# Altium PCB Control_Board.PcbDoc (part 4 of 4)
Units mm, origin at the board's own origin, x right, y up, seen from the top; angles counter-clockwise.
Board outline 90.17 x 96 mm, 6 copper layers (Top Layer, GND, POWER, Signal, PGND, Bottom Layer), stack 1.346 mm thick; 251 components, 196 nets, 963 pads, 633 vias.
Unrouted connection lines stored in the file: 3.
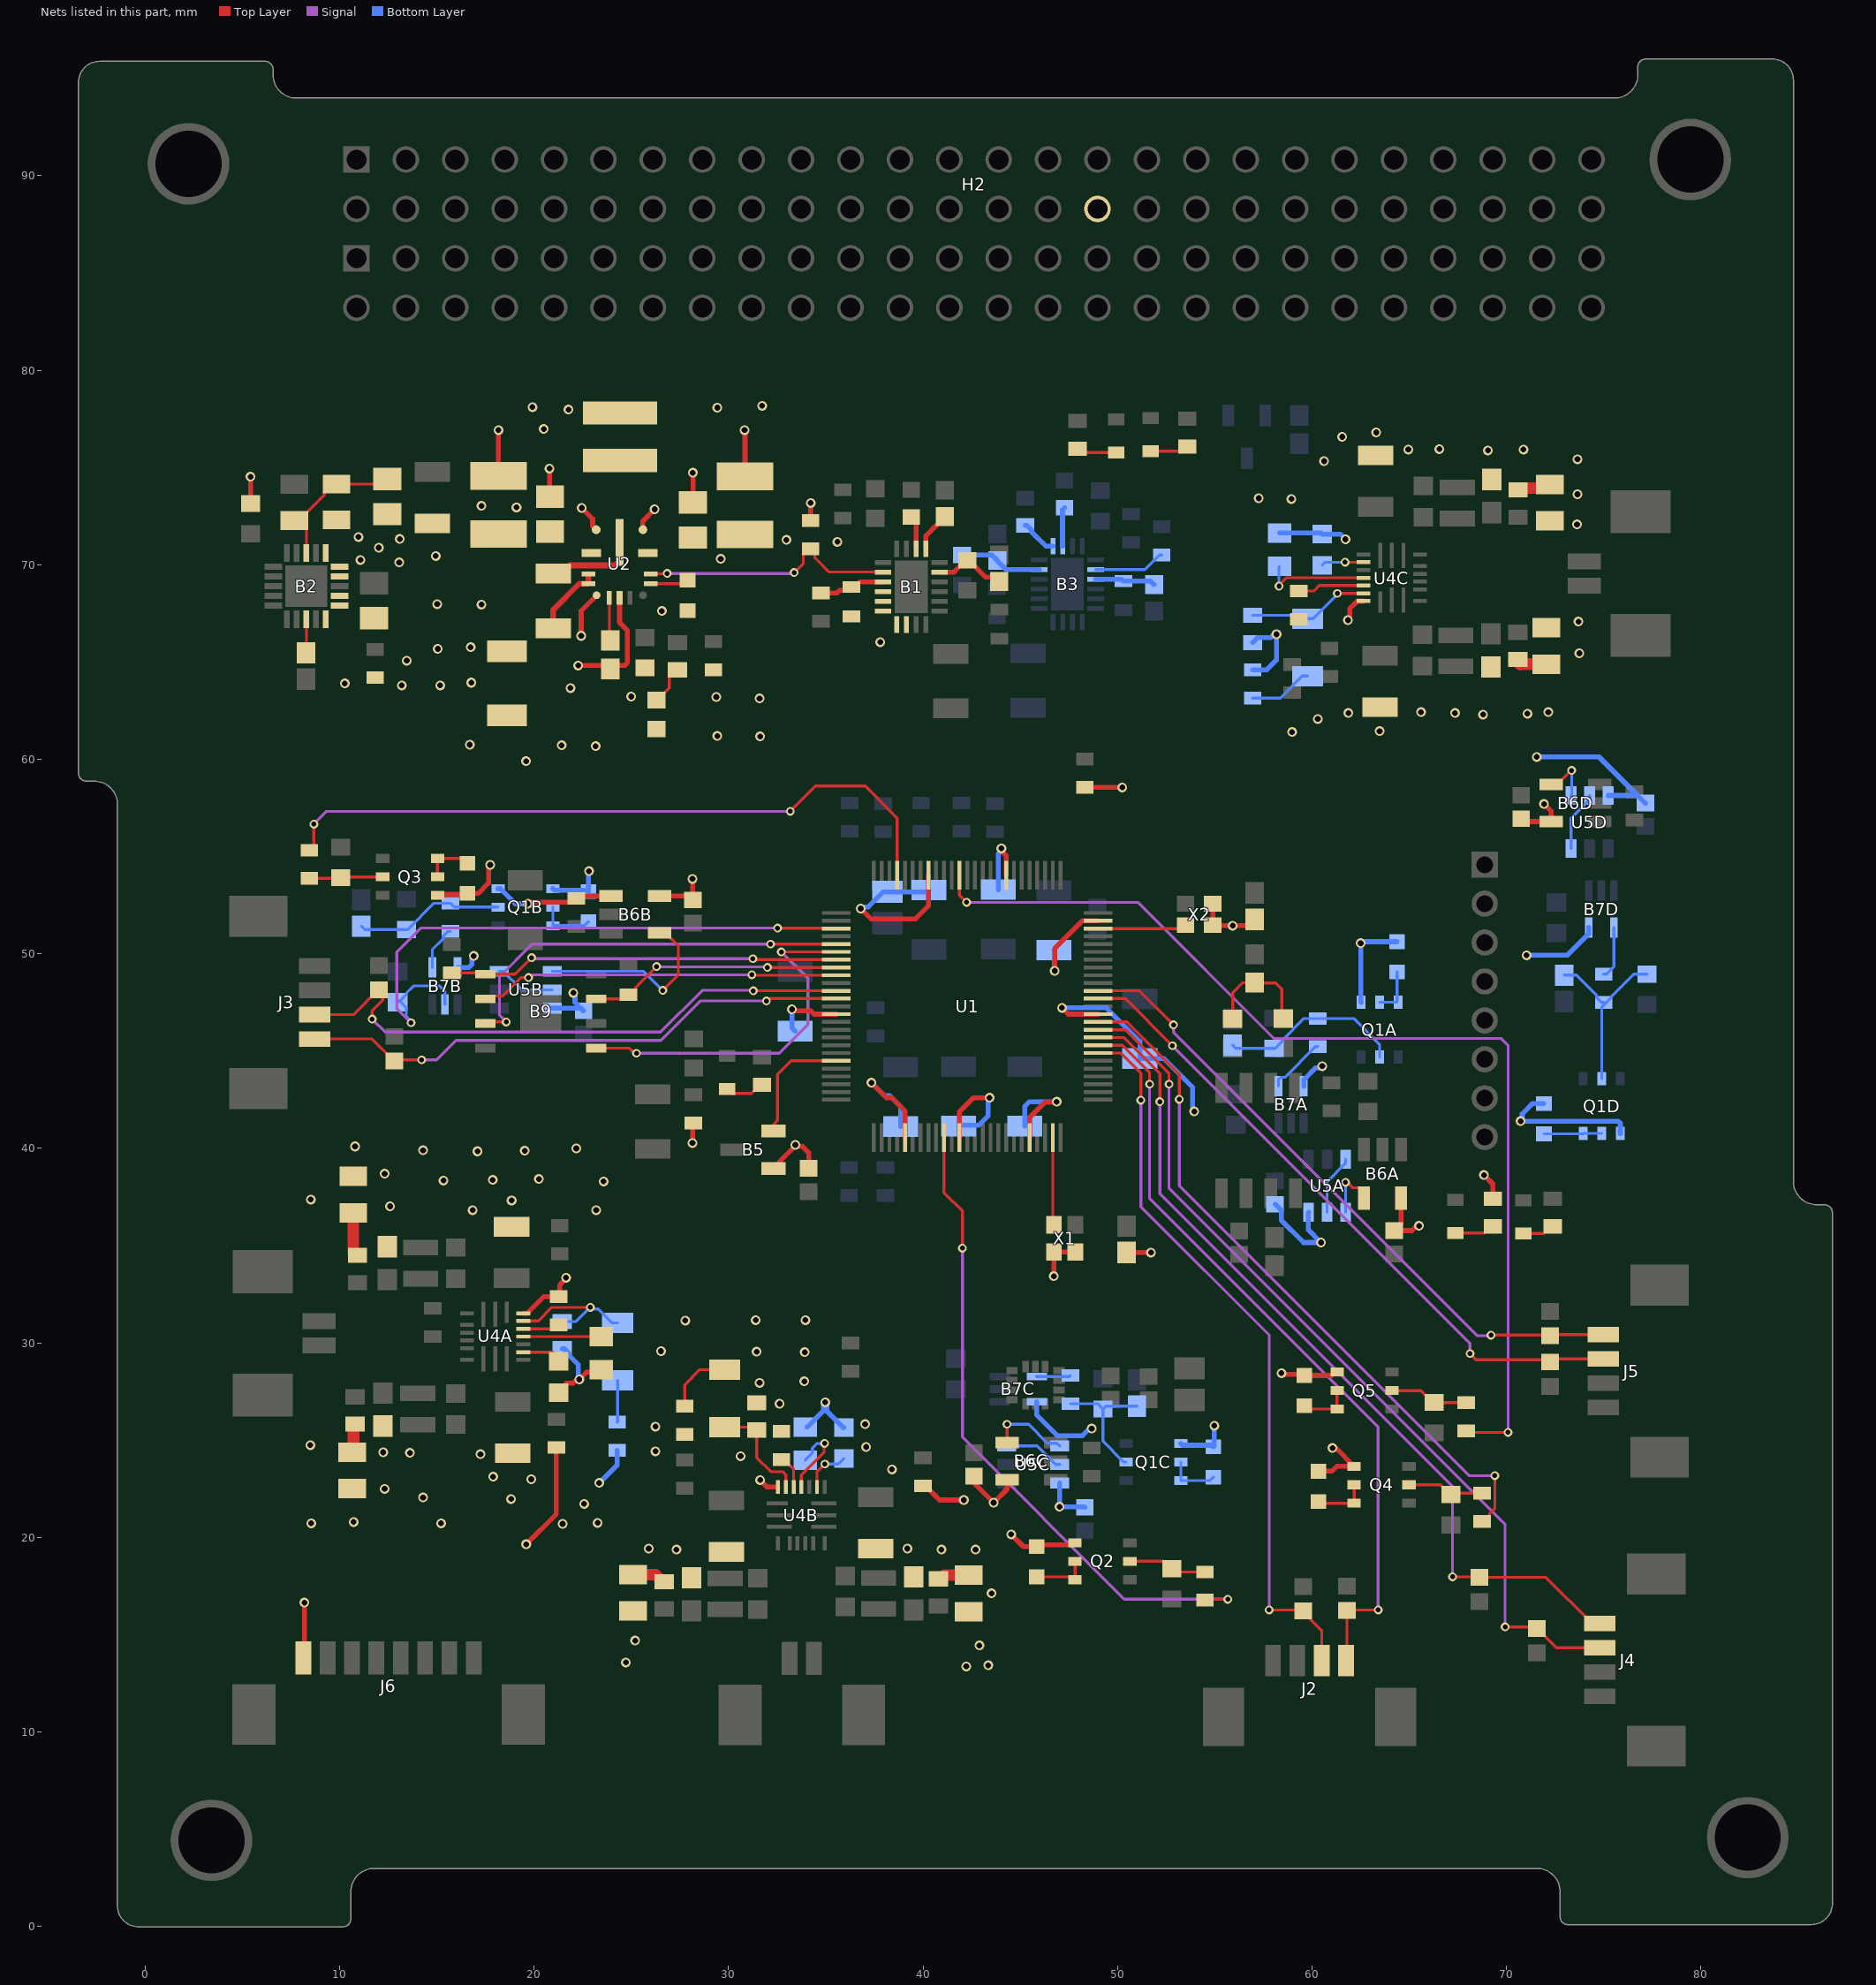
[diagram p7: the nets of this part, all layers, seen from the top]

## Via types
v1: diameter 0.5, hole 0.3, Top Layer to Bottom Layer, 487 vias
v2: diameter 0.45, hole 0.25, Top Layer to Bottom Layer, tented both sides, 146 vias

## Nets (pads, with @x,y where several pads share a name; then routed paths per layer and width w, separated by ;. In a path a pad name is that pad's centre, name@x,y a point inside that pad or via, vN(x,y) a via of type N, cw(c..) or ccw(c..) an arc to the next point about the centre after c; other vN are vias at no path point) (continued)
MRAM-CS: B9.1 R74.1 U1.7 | length 20.2
  Top Layer w0.15: R74.1@15.775,49.025 17.43,49.025 17.505,48.95 19.025,48.95 v2(19.875,49.8) ; v2(31.25,49.75) 31.3,49.7 U1.7@35.537,49.7
  Signal w0.15: v2(19.875,49.8) 19.925,49.75 v2(31.25,49.75)
MRAM-EN: B7B.2 R58B.2 U1.3 | length 32
  Top Layer w0.15: v2(32.525,51.325) 32.538,51.312 35.524,51.312 U1.3@35.537,51.3
  Signal w0.15: v2(13.677,46.459) 12.95,47.185 12.95,50.1 14.175,51.325 v2(32.525,51.325)
  Bottom Layer w0.15: R58B.2@13,47.51 R58B.2@13.082,47.592 ; v2(13.677,46.459) 13.677,46.567 13.435,46.809 13.435,47.239 R58B.2@13.082,47.592 ; B7B.2@15.425,47.4 15.425,48.065 15.14,48.35 13.814,48.35 13.435,47.971 13.435,47.905 13.122,47.592 R58B.2@13.082,47.592
MRAM-HOLD: B9.7 R75.2 U1.8 | length 13.1
  Top Layer w0.15: B9.7@23.2,47.685 24.635,47.685 R75.2@24.85,47.9 ; R75.2@24.851,47.9 24.975,47.9 25.225,48.15 25.225,48.274 v2(26.3,49.35) ; v2(32,49.3) U1.8@35.537,49.3
  Signal w0.15: v2(26.3,49.35) 26.325,49.325 31.975,49.325 v2(32,49.3)
MRAM-MISO: B9.2 U1.9 | length 18.6
  Top Layer w0.15: B9.2@17.5,47.685 17.65,47.835 18.395,47.835 19.326,48.766 19.706,48.766 v2(19.72,48.78) ; v2(31.2,48.925) 31.225,48.9 U1.9@35.537,48.9
  Signal w0.15: v2(19.72,48.78) 19.801,48.78 19.946,48.925 v2(31.2,48.925)
MRAM-MOSI: B9.5 U1.6 | length 18.7
  Top Layer w0.15: B9.5@23.2,45.145 23.205,45.15 24.902,45.15 25.162,44.89 v2(25.27,44.89) ; v2(32.72,50.1) U1.6@35.537,50.1
  Signal w0.15: v2(25.27,44.89) 32.61,44.89 34.08,46.36 34.08,48.74 v2(32.72,50.1)
MRAM-VSEN: B6B.1 Q1B.3 R73.2 | length 6.3
  Top Layer w0.254: v1(19.675,52.575) 19.76,52.66 21.985,52.66 R73.2@22.175,52.85 ; R73.2@22.162,52.837 22.3,52.975 B6B.1@23.95,52.975
  Bottom Layer w0.254: Q1B.3@18.156,53.35 18.27,53.35 19.045,52.575 v1(19.675,52.575)
MRAM-WP: B9.3 U1.5 | length 21.6
  Top Layer w0.15: B9.3@17.5,46.415 17.584,46.499 v2(18.572,46.499) ; v2(32.16,50.5) U1.5@35.537,50.5
  Signal w0.15: v2(18.572,46.499) 18.23,46.841 18.23,48.83 19.9,50.5 v2(32.16,50.5)
NetB1_3: B1.3 R18.2 R21.2 | length 3.4
  Top Layer w0.254: R21.2@34.75,68.55 35.581,68.55 35.708,68.677 36.152,68.677 R18.2@36.325,68.85 36.475,68.85 36.75,69.125 B1.3@37.95,69.125
NetB1_17: B1.17 R25.2 | length 2.1
  Top Layer w0.254: B1.17@40.15,70.825 40.15,71.495 40.767,72.112 40.787,72.112 41.125,72.45 R25.2@41.125,72.47
NetB1_18: B1.18 C14.1 | length 1.7
  Top Layer w0.254: C14.1@39.375,72.422 39.65,72.147 B1.18@39.65,70.825
NetB2_3: B2.3 C15.2 R28.2 R30.2 | length 7.8
  Top Layer w0.15: B2.3@8.3,70.6 8.3,71.86 7.89,72.27 R30.2@7.675,72.27 7.9,72.27 9.227,73.596 9.227,73.745 9.631,74.149 R28.2@9.85,74.149 12.199,74.149 C15.2@12.45,74.4
NetB2_13: B2.13 C18.2 | length 1.7
  Top Layer w0.15: C18.2@8.275,65.478 8.3,65.503 B2.13@8.3,67.2
NetB3_3: B3.3 R39.2 R41.2 | length 3.1
  Bottom Layer w0.254: B3.3@48.875,69.25 48.877,69.248 50.212,69.248 R39.2@50.302,69.159 51.696,69.159 R41.2@51.875,68.98
NetB3_17: B3.17 R44.1 | length 1.9
  Bottom Layer w0.254: R44.1@45.25,72.027 45.339,72.027 45.593,71.773 45.593,71.684 46.326,70.95 B3.17@46.675,70.95
NetB3_18: B3.18 C29.1 | length 2
  Bottom Layer w0.254: B3.18@47.175,70.95 47.175,72.825 C29.1@47.275,72.925
NetB7A_4: B7A.4 R57A.2 | length 3.1
  Bottom Layer w0.15: B7A.4@58.275,43.2 58.275,43.525 58.4,43.65 58.6,43.65 60.175,45.225 R57A.2@60.3,45.225
NetB7B_4: B7B.4 R57B.2 | length 2.3
  Bottom Layer w0.15: B7B.4@14.775,49.3 14.775,50.225 15.325,50.775 15.325,50.9 15.575,51.15 R57B.2@15.7,51.15
NetB7C_4: B7C.4 R57C.2 | length 1.8
  Bottom Layer w0.15: B7C.4@45.85,28.275 47.533,28.275 R57C.2@47.583,28.325
NetB7D_4: B7D.4 R57D.2 | length 2.7
  Bottom Layer w0.15: R57D.2@75,48.95 75.125,48.95 75.525,49.35 B7D.4@75.525,51.35
NetC22_1: C22.1 U2.13 U2.14 | length 3.8
  Top Layer w0.305: C22.1@20.987,66.738 20.987,67.687 22.325,69.025 U2.14@22.8,69.025 U2.13@22.8,69.525
NetC24_2: C24.2 R32.2 | length 2.1
  Top Layer w0.15: R32.2@26.3,63.047 26.341,63.047 26.955,63.661 26.955,64.285 27.27,64.6 C24.2@27.375,64.6
NetC26_2: C26.2 U2.2 | length 2.2
  Top Layer w0.15: U2.2@23.875,68.3 23.875,66.153 C26.2@23.925,66.103
NetC35A_1: C35A.1 C41A.1 U4A.18 | length 7.2
  Top Layer w0.15: U4A.18@19.45,31.125 20.225,31.125 20.925,31.825 v2(22.9,31.825)
  Bottom Layer w0.15: C41A.1@21.45,31.1 22.175,31.1 v2(22.9,31.825) 22.977,31.748 23.302,31.748 24.025,31.025 C35A.1@24.3,31.025
NetC35A_2: C35A.2 R56A.2 | length 2.2
  Bottom Layer w0.15: R56A.2@24.275,25.925 24.3,25.95 C35A.2@24.3,28.075
NetC35B_1: C35B.1 C41B.1 U4B.18 | length 5.6
  Top Layer w0.15: C35B.1@29.8,25.675 31.3,25.675 C41B.1@31.45,25.525 31.45,24.1 32.17,23.38 32.78,23.38 32.95,23.21 U4B.18@32.95,22.6
NetC35B_2: C35B.2 R56B.2 | length 3.5
  Top Layer w0.15: R56B.2@27.75,26.75 27.75,27.85 28.525,28.625 C35B.2@29.8,28.625
NetC35C_1: C35C.1 C41C.1 U4C.18 | length 6.3
  Top Layer w0.15: v2(61.3,68.526) 61.302,68.528 62.65,68.528 U4C.18@62.653,68.531
  Bottom Layer w0.15: C41C.1@56.95,67.401 59.6,67.401 C35C.1@59.775,67.226 60.05,67.226 61.3,68.476 v2(61.3,68.526)
NetC35C_2: C35C.2 R56C.2 | length 3.3
  Bottom Layer w0.15: R56C.2@56.95,63.151 58.375,63.151 59.5,64.276 C35C.2@59.775,64.276
NetC36A_1: C36A.1 U4A.14 | length 2
  Top Layer w0.15: U4A.14@19.45,29.525 20.975,29.525 C36A.1@21.325,29.175
NetC36B_1: C36B.1 U4B.14 | length 2.4
  Top Layer w0.15: U4B.14@34.55,22.6 34.55,23.375 v2(34.95,23.775)
  Bottom Layer w0.15: v2(34.95,23.775) 35.65,23.775 C36B.1@35.925,24.05
NetC36C_1: C36C.1 U4C.14 | length 2.2
  Top Layer w0.15: v2(61.705,70.131) U4C.14@62.653,70.131
  Bottom Layer w0.15: C36C.1@60.525,69.976 60.68,70.131 v2(61.705,70.131)
NetC42A_2: C42A.2 R52A.2 | length 2.3
  Top Layer w0.6: R52A.2@10.715,36.688 10.715,34.605 10.82,34.5 C42A.2@10.925,34.5
NetC42B_2: C42B.2 R52B.2 | length 1.8
  Top Layer w0.6: R52B.2@25.1,18.085 26.26,18.085 26.505,17.84 26.505,17.815 26.595,17.725 C42B.2@26.7,17.725
NetC42C_2: C42C.2 R52C.2 | length 1.6
  Top Layer w0.6: C42C.2@70.375,65.1 70.48,65.1 C42C.2@70.715,64.865 ; C42C.2@70.927,64.89 R52C.2@72.047,64.89
NetC43A_2: C43A.2 R54A.2 | length 1.5
  Top Layer w0.6: R54A.2@10.65,24.385 10.725,24.46 10.725,25.75 C43A.2@10.8,25.825
NetC43B_2: C43B.2 R54B.2 | length 1.6
  Top Layer w0.6: C43B.2@40.8,17.875 40.905,17.875 41.09,18.06 R54B.2@42.35,18.06
NetC43C_2: C43C.2 R54C.2 | length 1.7
  Top Layer w0.6: C43C.2@70.44,73.85 70.53,73.94 71.915,73.94 R54C.2@72.06,74.085
NetC47_1: C47.1 R62.2 R63.2 | length 5.5
  Top Layer w0.15: R62.2@55.925,46.617 55.925,48 56.438,48.513 57.041,48.513 C47.1@57.05,48.522 ; C47.1@57.05,48.494 58.137,48.494 58.45,48.182 R63.2@58.45,46.95
NetLED1_2: LED1.2 R3.1 | length 1.7
  Top Layer w0.15: LED1.2@30.2,42.824 31.184,42.824 31.623,43.264 R3.1@31.725,43.264
NetLED2_2: LED2.2 R19.1 | length 2.1
  Top Layer w0.15: LED2.2@67.375,35.649 68.859,35.649 69.198,35.989 R19.1@69.3,35.989
NetLED3_2: LED3.2 R23.1 | length 1.9
  Top Layer w0.15: R23.1@47.95,75.964 48.14,75.774 LED3.2@49.75,75.774
NetLED4_2: LED4.2 R36.1 | length 1.7
  Top Layer w0.15: LED4.2@70.875,35.624 71.909,35.624 72.273,35.989 R36.1@72.375,35.989
NetLED5_2: LED5.2 R37.1 | length 2.1
  Top Layer w0.15: LED5.2@51.714,75.84 53.476,75.84 R37.1@53.71,76.074
NetQ1A_5: Q1A.5 Q1A.6 R59A.1 | length 2.4
  Bottom Layer w0.15: Q1A.5@63.475,47.51 64.325,47.51 64.375,47.56 R59A.1@64.375,49.069
NetQ1B_5: Q1B.5 Q1B.6 R59B.1 | length 2.9
  Bottom Layer w0.15: Q1B.5@20.975,52.4 Q1B.6@20.975,51.45 22.603,51.45 R59B.1@22.8,51.647
NetQ1C_5: Q1C.5 Q1C.6 R59C.1 | length 2.7
  Bottom Layer w0.15: Q1C.5@53.26,23.875 Q1C.6@53.26,22.925 54.753,22.925 R59C.1@54.925,23.097
NetQ1D_5: Q1D.5 Q1D.6 R59D.1 | length 3
  Bottom Layer w0.15: R59D.1@71.925,40.747 73.932,40.747 Q1D.6@73.95,40.765 Q1D.5@74.9,40.765
NetQ2_2: Q2.2 R76.1 R79.2 | length 4.1
  Top Layer w0.15: Q2.2@50.635,18.775 52.363,18.775 52.743,18.395 R79.2@52.798,18.395 52.968,18.225 R76.1@54.5,18.225
NetQ2_5: Q2.5 Q2.6 R78.1 | length 3
  Top Layer w0.15: R78.1@45.85,17.972 47.668,17.972 Q2.6@47.815,17.825 Q2.5@47.815,18.775
NetQ3_2: Q3.2 R77.1 R81.2 | length 3.8
  Top Layer w0.15: R77.1@8.45,53.875 10.014,53.875 R81.2@10.057,53.918 10.094,53.955 Q3.2@12.22,53.955
NetQ3_5: Q3.5 Q3.6 R80.1 | length 2.6
  Top Layer w0.15: Q3.5@15.039,53.955 Q3.6@15.039,54.905 16.328,54.905 R80.1@16.572,54.66
NetQ4_2: Q4.2 R82.1 R86.2 | length 3.8
  Top Layer w0.15: Q4.2@64.987,22.708 66.592,22.708 R86.2@67.095,22.205 ; R86.2@67.22,22.275 R82.1@68.75,22.275
NetQ4_5: Q4.5 Q4.6 R84.1 | length 2.7
  Top Layer w0.15: R84.1@60.414,21.758 Q4.6@62.168,21.758 Q4.5@62.168,22.708
NetQ5_2: Q5.2 R83.1 R87.2 | length 4.1
  Top Layer w0.15: Q5.2@64.11,27.55 65.61,27.55 66.218,26.942 R87.2@66.273,26.942 66.29,26.925 R83.1@67.925,26.925
NetQ5_5: Q5.5 Q5.6 R85.1 | length 2.7
  Top Layer w0.15: R85.1@59.6,26.772 59.772,26.6 Q5.6@61.29,26.6 Q5.5@61.29,27.55
NetR33_1: R33.1 U2.6 | length 2
  Top Layer w0.15: U2.6@26,69.025 27.722,69.025 R33.1@27.9,69.203
NetR50A_2: R50A.2 U4A.16 | length 4
  Top Layer w0.15: U4A.16@19.45,30.325 23.447,30.325 R50A.2@23.45,30.328
NetR50B_2: R50B.2 U4B.16 | length 4.2
  Top Layer w0.15: U4B.16@33.75,22.6 33.75,23.209 34.911,24.37 34.911,24.806 v2(34.945,24.84)
  Bottom Layer w0.15: R50B.2@33.95,23.972 34.317,24.339 34.317,24.591 34.558,24.832 34.937,24.832 v2(34.945,24.84)
NetR50C_2: R50C.2 U4C.16 | length 5.6
  Top Layer w0.15: v2(58.3,68.901) 58.3,68.947 58.683,69.331 U4C.16@62.653,69.331
  Bottom Layer w0.15: v2(58.3,68.901) 58.3,69.898 R50C.2@58.325,69.923
NetR51A_1: R51A.1 U4A.17 | length 1.9
  Top Layer w0.15: U4A.17@19.45,30.725 21.075,30.725 R51A.1@21.275,30.925
NetR51B_1: R51B.1 U4B.17 | length 1.7
  Top Layer w0.15: R51B.1@32.725,24 32.85,24 33.35,23.5 U4B.17@33.35,22.6
NetR51C_1: R51C.1 U4C.17 | length 3.4
  Top Layer w0.15: R51C.1@59.325,68.651 60.1,68.651 60.38,68.931 U4C.17@62.653,68.931
OVP-3V3: B1.15 R20.1 R24.2 | length 3.8
  Top Layer w0.254: B1.15@40.85,69.625 41.595,69.625 42.22,70.25 42.275,70.25 42.33,70.25 43.217,69.363 43.622,69.363 R24.2@43.925,69.06
OVP-5V: B3.15 R40.1 R43.2 | length 4.3
  Bottom Layer w0.254: R40.1@42,70.495 43.55,70.495 R43.2@43.825,70.22 43.825,70.2 44.275,69.75 B3.15@45.975,69.75
PG-STEP-3V3: B1.2 R27.2 U2.7 | length 13.4
  Top Layer w0.15: U2.7@26,69.525 26.013,69.537 26.838,69.537 v2(26.85,69.55) ; v2(33.375,69.6) 33.85,70.075 33.85,70.575 34.1,70.825 R27.2@34.225,70.825 34.437,70.613 34.437,70.363 35.175,69.625 B1.2@37.95,69.625
  Signal w0.15: v2(26.85,69.55) 33.325,69.55 v2(33.375,69.6)
PG-STEP-5V: B3.2 R46.2 | length 3.7
  Bottom Layer w0.15: B3.2@48.875,69.75 51.4,69.75 52.15,70.5 R46.2@52.275,70.5
PGND: C19.2 C20.2 C21.2 C23.2 C25.1 C26.1 C36A.2 C36B.2 C36C.2 C37A.2 C37B.2 C37C.2 C38A.2 C38B.2 C38C.2 C39A.1 C39B.1 C39C.1 C40A.1 C40B.1 C40C.1 C41A.2 C41B.2 C41C.2 H2.32 R33.2 R35.1 R50A.1 R50B.1 R50C.1 R51A.2 R51B.2 R51C.2 R52A.1 R52B.1 R52C.1 R54A.1 R54B.1 R54C.1 R56A.1 R56B.1 R56C.1 U2.3 U2.9 U2.11 U4A.19 U4B.19 U4C.19 | length 40.5
  Top Layer w0.254: C37A.2@12.5,35.225 C37A.2@12.5,35.275 ; C21.2@18.175,74.565 v1(18.175,76.925) ; U4A.19@19.45,31.525 19.653,31.525 20.503,32.375 R51A.2@21.275,32.375 21.325,32.425 21.325,32.977 21.65,33.302 v1(21.65,33.35) ; v1(20.8,74.95) 20.8,73.225 C19.2@20.825,73.2 ; C36A.2@21.325,27.575 21.673,27.923 22.002,27.923 22.204,28.125 v1(22.325,28.125) ; v1(22.275,64.825) 23.747,64.825 C26.1@23.925,64.647 24.109,64.832 24.682,64.832 24.8,64.95 24.8,66.629 24.4,67.029 U2.3@24.4,68.3 ; v1@22.446,28.125 v1(22.325,28.125) ; v1(22.455,72.921) 23.015,72.361 23.015,71.985 ; R50A.1@23.45,28.622 23.319,28.491 22.691,28.491 v1(22.325,28.125) ; U2.9@25.6,71.8 25.6,72.25 v1(26.2,72.85) ; v1(28.161,74.728) 28.175,74.714 C23.2@28.175,73.2 ; v1(30.825,76.925) 30.85,76.9 C20.2@30.85,74.54 ; v1(31.625,22.95) 31.975,22.6 U4B.19@32.55,22.6 ; v1(61.85,67.151) 61.935,67.236 61.935,67.736 62.33,68.131 U4C.19@62.653,68.131 ; C38C.2@69.145,74.278 C38C.2@69.145,74.328
  Bottom Layer w0.254: C41A.2@21.463,29.7 21.555,29.7 21.818,29.437 21.818,29.345 22.284,28.879 22.284,28.166 v1(22.325,28.125) ; v1(23.35,22.8) 24.275,23.725 R56A.1@24.275,24.475 ; R50B.1@34.047,25.678 34.89,26.52 34.89,26.865 v1(34.975,26.95) 35.06,26.865 35.06,26.49 35.9,25.65 C36B.2@35.925,25.65 ; R56C.1@56.95,64.601 57.675,64.601 58.175,65.101 v1(58.175,66.425) 58.054,66.425 57.893,66.264 57.213,66.264 C41C.2@56.95,66.001 ; R50C.1@58.325,71.629 60.472,71.629 C36C.2@60.525,71.576 61.453,71.576 v1(61.72,71.309)
  other v1: 42.225,13.375 43.35,13.425 24.725,13.575 42.9,14.45 25.2,14.7 43.525,17.125 27.325,19.375 40.95,19.375 42.7,19.375 25.9,19.425 39.2,19.425 21.475,20.7 8.55,20.725 15.225,20.725 23.275,20.75 10.725,20.8 22.575,21.725 18.825,21.975 14.3,22.05 12.325,22.5 19.858,22.991 17.9,23.125 38.4,23.5 30.625,24.175 17.25,24.275 13.625,24.35 12.25,24.375 26.25,24.425 37.075,24.65 8.5,24.75 26.25,25.7 37.025,25.825 32.625,26.875 31.6,27.95 33.9,28.025 33.925,29.525 31.45,29.55 26.525,29.575 27.775,31.15 31.4,31.175 33.95,31.175 16.85,36.825 23.2,36.825 12.6,37.025 18.85,37.325 8.525,37.375 23.575,38.3 15.35,38.35 17.875,38.375 20.25,38.425 12.325,38.7 17.1,39.85 19.525,39.875 14.3,39.9 22.175,40 10.8,40.1 19.597,59.902 23.173,60.673 21.423,60.723 16.698,60.748 31.625,61.175 29.425,61.2 58.975,61.4 63.475,61.45 60.3,62.075 68.8,62.3 71.075,62.35 61.875,62.375 67.35,62.375 65.6,62.425 72.15,62.425 31.6,63.125 29.375,63.2 73.75,65.45 73.7,67.075 26.578,67.623 73.625,72.075 58.94,73.38 57.26,73.42 73.65,73.625 60.625,75.325 73.65,75.425 69.05,75.875 64.95,75.925 70.875,75.925 66.55,75.95 61.55,76.575 63.3,76.8 29.425,78.075 31.725,78.175
POSC: U1.49 X1.3 | length 4.3
  Top Layer w0.15: X1.3@46.675,36.268 U1.49@46.675,40.562
SOSC: U1.73 X2.3 | length 4.6
  Top Layer w0.15: U1.73@49.013,51.3 53.325,51.3 X2.3@53.5,51.475
SPXM-SCL: J3.4 R68.2 U1.12 | length 28.6
  Top Layer w0.15: J3.4@8.725,45.625 11.674,45.625 12.799,44.499 R68.2@12.825,44.499 12.876,44.55 v2(14.225,44.55) ; v2(31.95,47.58) 32.031,47.58 32.151,47.7 U1.12@35.537,47.7
  Signal w0.15: v2(14.225,44.55) 15,44.55 16,45.55 26.525,45.55 28.555,47.58 v2(31.95,47.58)
SPXM-SDA: J3.3 R66.2 U1.11 | length 30.7
  Top Layer w0.15: J3.3@8.725,46.875 10.725,46.875 11.999,48.149 R66.2@12.025,48.149 12.226,47.948 12.226,47.606 11.68,47.06 v2(11.68,46.646) ; v2(31.275,48.1) U1.11@35.537,48.1
  Signal w0.15: v2(11.68,46.646) 12.351,45.975 26.5,45.975 28.65,48.125 31.25,48.125 v2(31.275,48.1)
SPYM-SCL: J5.4 R72.2 U1.65 | length 33.6
  Top Layer w0.15: U1.65@49.013,48.1 51.125,48.1 v2(52.875,46.35) ; v2(69.2,30.4) 72.224,30.4 R72.2@72.25,30.374 72.301,30.425 J5.4@74.975,30.425
  Signal w0.15: v2(52.875,46.35) 52.885,46.34 52.885,45.965 68.475,30.375 69.175,30.375 v2(69.2,30.4)
SPYM-SDA: J5.3 R70.2 U1.64 | length 34.3
  Top Layer w0.15: U1.64@49.013,47.7 50.4,47.7 v2(52.825,45.275) ; v2(68.125,29.45) 68.435,29.14 71.887,29.14 72.226,28.801 72.599,29.175 J5.3@74.975,29.175
  Signal w0.15: v2(52.825,45.275) 68.125,29.975 v2(68.125,29.45)
SPYP-SCL: J4.4 R71.2 U1.59 | length 44.6
  Top Layer w0.15: U1.59@49.013,45.7 50.325,45.7 52.175,43.85 v2(52.175,42.4) ; v2(67.225,17.975) 68.576,17.975 R71.2@68.6,17.951 72.024,17.951 74.4,15.575 J4.4@74.8,15.575
  Signal w0.15: v2(52.175,42.4) 52.175,37.675 67.225,22.625 v2(67.225,17.975)
SPYP-SDA: J4.3 R69.2 U1.60 | length 45.5
  Top Layer w0.15: U1.60@49.013,46.1 50.4,46.1 52.65,43.85 v2(52.65,43.3) ; v2(69.925,15.4) 71.475,15.4 R69.2@71.55,15.325 71.576,15.325 72.576,14.325 J4.3@74.8,14.325
  Signal w0.15: v2(52.65,43.3) 52.65,37.95 69.925,20.675 v2(69.925,15.4)
SPZP-SCL: J2.4 R67.2 U1.58 | length 39.9
  Top Layer w0.15: U1.58@49.013,45.3 50.25,45.3 51.65,43.9 v2(51.65,43.3) ; J2.4@61.75,13.675 61.8,13.725 R67.2@61.8,16.249 61.826,16.275 v2(63.4,16.275)
  Signal w0.15: v2(51.65,43.3) 51.65,37.425 63.4,25.675 v2(63.4,16.275)
SPZP-SDA: J2.3 R65.2 U1.57 | length 37.7
  Top Layer w0.15: U1.57@49.013,44.9 50.175,44.9 51.2,43.875 v2(51.2,42.475) ; v2(57.8,16.275) 59.499,16.275 R65.2@59.55,16.224 ; R65.2@59.501,16.224 60.5,15.225 J2.3@60.5,13.675
  Signal w0.15: v2(51.2,42.475) 51.2,37 57.8,30.4 v2(57.8,16.275)
SW-3V3: C22.2 L1.1 U2.10 | length 4.7
  Top Layer w0.305: C22.2@20.987,69.538 21.387,69.538 21.82,69.971 24.174,69.971 24.305,70.103 24.353,70.103 24.4,70.15 U2.10@24.4,71.15
SwitchCAN-CurrSense: C46A.2 Q1A.2 R57A.1 R60A.2 | length 9.5
  Bottom Layer w0.15: C46A.2@55.925,45.297 56.082,45.14 R60A.2@58.05,45.14 58.105,45.14 58.465,45.5 58.465,45.555 59.585,46.675 R57A.1@60.3,46.675 62.15,46.675 63.475,45.35 Q1A.2@63.475,44.69
SwitchIMU-CurrSense: C46C.2 Q1C.2 R57C.1 R60C.2 | length 6.9
  Bottom Layer w0.15: R57C.1@47.583,26.875 48.97,26.875 R60C.2@49.25,26.595 ; Q1C.2@50.44,23.875 50.326,23.875 49.25,24.951 R60C.2@49.25,26.595 ; C46C.2@51,26.747 49.402,26.747 R60C.2@49.25,26.595
SwitchMGN-CurrSense: C46D.2 Q1D.2 R57D.1 R60D.2 | length 9.4
  Bottom Layer w0.15: C46D.2@72.975,48.903 73.597,48.903 74.625,47.875 74.625,47.75 74.875,47.5 R57D.1@75,47.5 ; Q1D.2@74.9,43.585 74.9,47.275 75.375,47.75 75.375,47.79 76.54,48.955 R60D.2@77.225,48.955
SwitchMRAM-CurrSense: C46B.2 Q1B.2 R57B.1 R60B.2 | length 7.7
  Bottom Layer w0.15: C46B.2@11.125,51.422 11.302,51.245 R60B.2@13.45,51.245 13.505,51.245 14.86,52.6 R57B.1@15.7,52.6 15.9,52.4 Q1B.2@18.156,52.4
TEMP-MEAS: B5.2 U1.20 | length 6.3
  Top Layer w0.15: B5.2@32.31,40.89 32.31,41.22 32.525,41.435 32.525,43.8 33.225,44.5 U1.20@35.537,44.5
VampCAN-CurrSense: B6A.4 U5A.4 | length 3
  Top Layer w0.15: v2(61.725,38.25) 61.833,38.25 62.108,37.975 62.45,37.975 62.675,37.75 B6A.4@62.675,37.45
  Bottom Layer w0.15: U5A.4@61.725,36.713 v2(61.725,38.25)
VampIMU-CurrSense: B6C.4 U5C.4 | length 4.1
  Top Layer w0.15: v2(44.32,25.82) 44.32,24.88 B6C.4@44.325,24.875
  Bottom Layer w0.15: v2(44.32,25.82) 45.43,25.82 46.402,24.848 46.877,24.848 U5C.4@47.025,24.7
VampMGN-CurrSense: B6D.4 U5D.4 | length 2.6
  Top Layer w0.15: B6D.4@72.3,58.7 72.6,58.7 73.325,59.425 v2(73.35,59.425)
  Bottom Layer w0.15: U5D.4@73.325,58.137 73.35,58.162 v2(73.35,59.425)
VampMRAM-CurrSense: B6B.4 U5B.4 | length 10
  Top Layer w0.15: B6B.4@26.45,51.075 26.75,51.075 27.423,50.402 27.423,48.923 v2(26.62,48.12)
  Bottom Layer w0.15: U5B.4@20.937,49.1 25.64,49.1 v2(26.62,48.12)
VConv: B2.15 B2.16 B2.17 C16.1 C25.2 L1.2 R31.2 R32.1 R34.2 U2.1 | length 2.4
  Top Layer w0.254: v1(22.427,66.347) 22.427,67.637 U2.1@23.22,68.43
  other v1: 25,63.225 21.875,63.66 13.2,63.8 15.175,63.8 10.275,63.9 16.78,63.94 13.456,65.07 15.05,65.675 16.74,65.76 17.3,67.95 15.025,67.975 20.5,76.975 21.775,77.975 19.925,78.1
VDD: B2.1 B2.19 B2.20 B5.1 B6A.5 B6B.5 B6C.5 B6D.5 B7A.5 B7B.5 B7C.5 B7D.5 C2.2 C3.2 C4.2 C5.2 C6.2 C7.2 C8.2 C9.2 C10.2 C11.2 C12.2 C15.1 C17.2 C33.1 C44A.1 C44B.1 C44C.1 C44D.1 C45A.1 C45B.1 C45C.1 C45D.1 J6.1 Q1A.4 Q1B.4 Q1C.4 Q1D.4 Q2.4 Q3.4 Q4.4 Q5.4 R1.2 R19.2 R28.1 R29.2 R53A.1 R53B.1 R53C.1 R59A.2 R59B.2 R59C.2 R59D.2 R78.2 R80.2 R84.2 R85.2 U1.14 U1.30 U1.37 U1.46 U1.62 U1.74 U1.83 U1.93 U5A.6 U5B.6 U5C.6 U5D.6 X1.1 X1.4 X2.1 X2.4 | length 152.4
  Top Layer w0.254: v1(5.425,74.525) 5.425,73.191 R29.2@5.431,73.185 ; J6.1@8.2,13.855 v1(8.2,16.65) ; Q3.4@15.039,53.005 15.089,53.055 16.522,53.055 R80.2@16.572,53.105 17.13,53.105 17.665,53.64 17.665,54.49 v1(17.75,54.575) ; v1(19.599,19.647) 21.15,21.197 R53A.1@21.15,24.625 ; B6B.5@26.45,52.975 27.975,52.975 C44B.1@28.15,52.8 ; v1(28.15,40.275) 28.15,41.25 R1.2@28.2,41.3 ; v1(28.15,53.85) C44B.1@28.15,52.8 ; C44B.1@28.175,52.775 C44B.1@28.15,52.8 ; B5.1@32.31,38.97 32.655,39.315 32.625,39.315 33.44,40.13 v1(33.44,40.18) 33.525,40.095 33.811,40.095 34.125,39.781 C33.1@34.125,38.975 ; v1(33.26,47.15) 33.345,47.065 34.233,47.065 34.398,46.9 U1.14@35.537,46.9 ; v1(36.8,52.325) 37.325,51.8 39.612,51.8 40.275,52.463 U1.93@40.275,54.038 ; v1(37.35,43.375) 38.117,42.608 38.393,42.608 39.075,41.925 U1.30@39.075,40.562 ; R53B.1@40,22.65 40.125,22.65 40.85,21.925 v1(42.1,21.925) ; U1.37@41.875,40.562 41.875,41.876 42.599,42.6 v1(43.425,42.6) ; C44C.1@42.625,23.15 42.625,22.796 v1(43.632,21.789) 44.325,22.483 B6C.5@44.325,22.975 ; v1(44.03,55.42) 44.03,55.299 44.275,55.054 U1.83@44.275,54.038 ; v1(44.53,20.162) 45.164,19.528 R78.2@45.85,19.528 45.949,19.626 47.717,19.626 Q2.4@47.815,19.725 ; U1.46@45.475,40.562 45.475,41.575 46.278,42.378 46.853,42.378 v1(46.875,42.4) ; v1(46.725,33.425) 46.725,34.663 X1.4@46.731,34.668 X1.1@47.831,34.668 X1.1@47.852,34.647 ; v1(46.775,49.125) 46.775,50.275 48.2,51.7 U1.74@49.013,51.7 ; v1(47.146,47.225) 47.471,46.9 U1.62@49.013,46.9 ; R53C.1@48.32,58.555 v1(50.245,58.555) ; C11.2@50.475,34.647 50.478,34.65 v1(51.725,34.65) ; X2.1@54.9,52.575 X2.4@54.9,51.475 54.925,51.45 v1(55.925,51.45) 56.728,51.45 C12.2@57.05,51.772 ; v1(58.425,28.45) 58.486,28.389 59.539,28.389 R85.2@59.6,28.328 61.004,28.328 61.176,28.5 Q5.4@61.29,28.5 ; R84.2@60.325,23.403 61.022,23.403 61.277,23.658 Q4.4@62.168,23.658 61.225,24.6 v1(61.05,24.6) ; C44A.1@64.225,35.775 65.138,35.775 65.379,36.016 v1(65.5,36.016) ; C44A.1@64.375,35.9 64.575,36.1 B6A.5@64.575,37.45 ; v1(68.841,38.629) 69.3,38.169 R19.2@69.3,37.411 ; C44D.1@70.75,56.95 70.9,56.8 B6D.5@72.3,56.8 72.3,57.325 v1(71.925,57.7)
  Bottom Layer w0.254: B7B.5@16.075,49.3 16.656,49.3 16.815,49.459 16.815,49.805 v1(16.9,49.89) ; U5B.6@20.937,47.2 C45B.1@22.4,47.2 ; Q1B.4@20.975,53.35 21.049,53.276 22.726,53.276 R59B.2@22.8,53.203 22.8,54.221 v1(22.828,54.249) ; v1(22.025,48) 22.11,47.915 22.11,47.515 22.227,47.398 22.227,47.373 C45B.1@22.4,47.2 ; v1(33.26,47.15) 33.26,46.192 C7.2@33.43,46.022 ; v1(36.8,52.325) 36.885,52.41 37.185,52.41 37.96,53.185 C9.2@38.175,53.185 40.207,53.185 C8.2@40.3,53.278 ; v1(37.35,43.375) 38.005,42.72 38.28,42.72 38.85,42.15 C6.2@38.85,41.122 ; C5.2@41.825,41.147 41.861,41.183 42.862,41.183 43.34,41.661 43.34,42.515 v1(43.425,42.6) ; C10.2@43.875,53.3 43.875,55.144 44.03,55.299 v1(44.03,55.42) ; C4.2@45.225,41.144 45.225,42.15 45.475,42.4 v1(46.875,42.4) ; B7C.5@45.85,26.975 45.85,26.287 46.904,25.233 48.198,25.233 48.565,25.6 v1(48.675,25.6) ; C2.2@46.725,50.197 46.775,50.147 v1(46.775,49.125) ; U5C.6@47.025,22.8 v1(47.025,21.575) 48.3,21.575 C45C.1@48.325,21.55 ; v1(47.146,47.225) 49.425,47.225 51.15,45.5 C3.2@51.15,44.622 52.378,44.622 53.865,43.135 v1@53.865,41.985 ; Q1C.4@53.26,24.825 53.346,24.739 54.839,24.739 R59C.2@54.925,24.653 54.975,24.703 v1(54.975,25.75) ; C45A.1@58.1,37.125 58.125,37.125 58.423,36.827 58.423,36.302 59.565,35.16 v1(60.46,35.16) 59.812,35.808 59.812,36.7 U5A.6@59.825,36.713 ; B7A.5@59.575,43.2 59.575,43.525 60.19,44.14 60.44,44.14 v1(60.525,44.225) ; v1(62.5,50.55) 62.512,50.538 62.512,47.522 Q1A.4@62.525,47.51 ; v1@62.525,50.525 62.625,50.625 R59A.2@64.375,50.625 ; v1(71.028,49.93) 73.13,49.93 74.225,51.025 B7D.5@74.225,51.35 ; v1(71.55,60.125) 74.75,60.125 76.725,58.15 76.75,58.15 76.75,58.125 77.125,57.75 C45D.1@77.15,57.75 ; R59D.2@71.903,42.303 71.336,42.303 70.81,41.778 70.81,41.485 v1(70.725,41.4) 75.74,41.4 75.85,41.29 Q1D.4@75.85,40.765 ; U5D.6@75.225,58.137 C45D.1@76.738,58.137 ; C45B.1@22.4,47.2 22.525,47.075 C45B.1@22.55,47.075 22.425,47.2 C45B.1@22.4,47.2
  other v1: 53.95,41.9 13.073,70.123 11.077,70.248 14.95,70.45 12.025,70.875 13.098,71.323 10.975,71.425
VrefCAN-CurrSense: U5A.3 U5A.5 | length 3.1
  Bottom Layer w0.15: U5A.5@60.775,36.713 60.775,38.28 61.725,39.23 U5A.3@61.725,39.437
VrefIMU-CurrSense: U5C.3 U5C.5 | length 3.1
  Bottom Layer w0.15: U5C.3@44.3,24.7 45.868,24.7 46.818,23.75 U5C.5@47.025,23.75
VrefMGN-CurrSense: U5D.3 U5D.5 | length 3.1
  Bottom Layer w0.15: U5D.3@73.325,55.413 73.325,56.98 74.275,57.93 U5D.5@74.275,58.137
VrefMRAM-CurrSense: U5B.3 U5B.5 | length 3.1
  Bottom Layer w0.15: U5B.3@18.213,49.1 18.42,49.1 19.37,48.15 U5B.5@20.937,48.15
VSwitch: B1.4 B1.5 B1.6 B1.7 B1.8 C19.1 C20.1 C21.1 C23.1 R18.1 R27.1 U2.8 U2.12 | length 0.9
  Top Layer w0.254: R27.1@34.225,72.275 34.225,73.169 v1(34.23,73.173)
  other v1: 37.8,66.025 29.6,70.3 35.6,71.175 32.975,71.275 19.1,72.95 17.3,73.025
XM-EN: R77.2 U1.97 | length 35.9
  Top Layer w0.15: R77.2@8.45,55.325 8.683,55.558 v2(8.683,56.665) ; v2(33.175,57.325) 34.473,58.623 37.027,58.623 38.675,56.975 U1.97@38.675,54.038
  Signal w0.15: v2(8.683,56.665) 9.343,57.325 v2(33.175,57.325)
YM-EN: R83.2 U1.89 | length 54.4
  Top Layer w0.15: U1.89@41.875,54.038 41.875,53.016 v2(42.245,52.646) ; R83.2@67.997,25.403 v2(70.081,25.403)
  Signal w0.15: v2(42.245,52.646) 51.054,52.646 58.05,45.65 69.725,45.65 70.081,45.294 v2(70.081,25.403)
YP-EN: R82.2 U1.61 | length 36.1
  Top Layer w0.15: U1.61@49.013,46.5 50.475,46.5 53.173,43.802 v2(53.173,42.527) ; R82.2@68.75,20.825 68.875,20.825 69.125,21.075 69.125,21.2 69.4,21.475 v2(69.4,23.175)
  Signal w0.15: v2(53.173,42.527) 53.173,38.077 68.075,23.175 v2(69.4,23.175)
ZP-EN: R76.2 U1.35 | length 34.1
  Top Layer w0.15: U1.35@41.075,40.562 41.075,37.725 42.025,36.775 v2(42.025,34.875) ; R76.2@54.5,16.775 54.55,16.825 v2(55.675,16.825)
  Signal w0.15: v2(42.025,34.875) 42.025,25.15 50.35,16.825 v2(55.675,16.825)
pads on no net: B1.20 B2.2 B2.5 B2.6 B2.7 B2.9 B2.10 B2.11 B3.20 D1.2 H1.01 H1.03 H1.05 H1.06 H1.07 H1.08 H1.09 H1.10 H1.11 H1.12 H1.13 H1.14 H1.15 H1.16 H1.17 H1.18 H1.19 H1.20 H1.21 H1.22 H1.23 H1.24 H1.25 H1.26 H1.27 H1.28 H1.29 H1.30 H1.31 H1.32 H1.33 H1.34 H1.35 H1.36 H1.37 H1.38 H1.39 H1.40 H1.41 H1.42 H1.43 H1.44 H1.45 H1.46 H1.47 H1.51 H1.52 H2.01 H2.02 H2.03 H2.04 H2.05 H2.06 H2.07 H2.08 H2.09 H2.10 H2.11 H2.12 H2.13 H2.14 H2.15 H2.16 H2.17 H2.18 H2.19 H2.20 H2.21 H2.22 H2.23 H2.24 H2.25 H2.26 H2.27 H2.28 H2.29 H2.30 H2.33 H2.34 H2.35 H2.36 H2.37 H2.38 H2.39 H2.40 H2.41 H2.42 H2.43 H2.44 H2.45 H2.46 H2.47 H2.48 H2.49 H2.50 H2.51 H2.52 J1A.3 J1A.4 J1B.3 J1B.4 J1C.3 J1C.4 J2.5 J2.6 J3.5 J3.6 J4.5 J4.6 J5.5 J5.6 J6.3 J6.9 J6.10 U1.51 U1.54 U1.55 U3.10 U3.11

## Polygon pours and split planes (outlines as drawn)
BSTNFIL1 on Top Layer "BSTNFIL1_L01_P072" (solid, pour order 72): 15.369,31.429 15.329,33.85 cw(c15.575,33.854) 15.575,34.1 16.975,34.1 16.975,31.075 15.717,31.085 cw(c15.719,31.435)
LNFIL1 on Top Layer "LNFIL1_L01_P066" (solid, remove dead copper, pour order 66): 17.61,30.786 16.967,30.794 16.983,34.127 13.104,34.139 13.104,35.786 17.61,35.819
5V on Top Layer "5V_L01_P084" (solid, remove dead copper, pour order 84): 17.68,34.975 17.68,30.43 18.93,30.43 18.93,32.377 20.475,32.377 20.475,34.975
GND on Top Layer "GND_L01_P145" (solid, remove dead copper, pour order 145): -3.429,100.16 -3.429,-1.5 88.15,-1.5 86.73,-0.08 86.73,100.44
MGTQ-NFIL3 on Top Layer "MGTQ-NFIL3_L01_P077" (solid, pour order 77): 66.713,65.55 70.812,65.55 ccw(c70.812,65.988) 71.25,65.988 71.25,67.475 cw(c71.7,67.475) 71.7,67.925 74.95,67.925 ccw(c74.95,68.3) 75.325,68.3 75.325,69.075 ccw(c74.925,69.075) 74.925,69.475 66.99,69.475 ccw(c66.99,68.885) 66.4,68.885 66.4,65.863 ccw(c66.713,65.863)
PGND on Top Layer "PGND_L01_P090" (solid, pour order 90): 24.987,12.675 43.213,12.675 ccw(c43.213,13.45) 43.988,13.45 43.988,19.692 ccw(c42.34,19.692) 43.506,20.858 39.414,24.949 cw(c42.616,28.15) 38.088,28.15 38.088,30.6 ccw(c36.963,30.6) 36.963,31.725 26.463,31.725 ccw(c26.463,30.55) 25.288,30.55 25.288,20.093 cw(c24.695,20.093) 24.695,19.5 ccw(c24.695,18.39) 23.584,18.393 23.569,14.097 ccw(c24.987,14.092)
VConv on Top Layer "VCONV_L01_P081" (solid, pour order 81): 9.125,67.838 9.125,64.503 ccw(c10.6,64.503) 10.563,63.029 ccw(c15.207,250.83) 23.537,63.156 cw(c23.372,61.352) 25.183,61.277 ccw(c25.802,61.252) 25.808,60.631 27.671,60.644 ccw(c27.667,61.289) 28.312,61.289 28.312,64.738 ccw(c27.575,64.738) 27.575,65.475 24.96,65.475 24.95,65.465 24.95,63.725 23.65,63.725 23.65,68.65 9.937,68.65 ccw(c9.937,67.838)
PGND on Top Layer "PGND_L01_P088" (solid, pour order 88): 75.325,69.825 75.3,69.8 75.3,62.25 cw(c73.775,62.25) 73.775,60.725 57.785,60.725 cw(c57.785,62.05) 56.46,62.05 56.46,74.901 cw(c58.934,74.901) 58.934,77.375 73,77.375 cw(c73,75.05) 75.325,75.05
5V on Top Layer "5V_L01_P082" (solid, pour order 82): 63.589,67.089 62.194,65.694 ccw(c63.147,64.742) 61.8,64.742 61.8,63.9 ccw(c62.225,63.9) 62.225,63.475 64.1,63.475 ccw(c64.1,63.875) 64.5,63.875 64.5,68.55 ccw(c64.2,68.55) 64.2,68.85 64.05,68.85 ccw(c64.05,68.75) 63.95,68.75 63.95,67.961 cw(c62.717,67.961)
5V-ADCS on Top Layer "5V-ADCS_L01_P061" (solid, remove dead copper, pour order 61): 39.395,67.823 39.384,65.671 ccw(c41.121,65.662) 41.121,63.925 44.077,63.925 ccw(c44.077,64.973) 45.125,64.973 45.125,67.921 ccw(c44.171,67.921) 44.171,68.875 40.452,68.875 ccw(c40.452,67.818)
5V on Top Layer "5V_L01_P086" (solid, pour order 86): 34.175,21.275 34.175,21.125 ccw(c34.4,21.125) 34.4,20.9 36.359,20.9 cw(c36.359,20.484) 36.775,20.484 ccw(c36.984,20.484) 36.984,20.275 41.825,20.275 ccw(c41.825,20.65) 42.2,20.65 42.2,22.2 ccw(c41.875,22.2) 41.875,22.525 41.076,22.525 cw(c41.076,22.768) 40.833,22.765 40.832,22.845 ccw(c40.61,22.842) 40.61,23.063 39.867,23.063 ccw(c39.867,22.223) 39.354,22.889 cw(c38.727,23.703) 38.727,22.675 36.7,22.675 ccw(c36.7,22.45) 36.475,22.45 36.475,22.3 cw(c35.65,22.3) 35.65,21.475 34.375,21.475 ccw(c34.375,21.275)
PGND on Top Layer "PGND_L01_P091" (solid, remove dead copper, pour order 91): 15.875,78.875 15.875,60.05 ccw(c16.5,60.05) 16.5,59.425 31.725,59.425 ccw(c31.725,60.075) 32.375,60.075 32.375,78.9
VSwitch on Top Layer "VSWITCH_L01_P059" (solid, remove dead copper, pour order 59): 26.639,71.82 25.255,71.347 ccw(c25.461,70.746) 24.825,70.745 24.825,70.6 ccw(c25.325,70.6) 25.325,70.1 28.075,70.1 cw(c28.075,65.45) 32.725,65.45 32.975,65.2 38.575,65.2 ccw(c38.575,66) 39.375,66 39.375,71.132 ccw(c38.688,71.132) 38.688,71.82 35.78,71.82 cw(c35.78,72.425) 35.175,72.425 35.174,73.776 ccw(c34.625,73.776) 34.625,74.325 33.65,74.325 ccw(c33.65,73.7) 33.025,73.7 33.025,72.8 cw(c32.606,72.8) 32.606,72.381 30.014,72.381 ccw(c30.013,61.953)
PGND on Top Layer "PGND_L01_P089" (solid, remove dead copper, pour order 89): 7.572,39.174 7.521,21.231 ccw(c8.799,21.228) 8.799,19.95 23.225,19.95 ccw(c23.225,21.275) 24.55,21.275 24.55,21.8 24.55,38.65 ccw(c22.372,38.65) 22.372,40.828 9.231,40.828 ccw(c9.231,39.169)
GND on Top Layer "GND_L01_P140" (solid, remove dead copper, pour order 140): 51.888,51.45 51.888,54.373 cw(c52.765,54.373) 52.765,55.25 58.3,55.25 cw(c58.3,54.388) 59.163,54.388 59.163,51.237 cw(c58.45,51.237) 58.45,50.525 52.475,50.525 cw(c52.475,51.112) 51.888,51.112
VSwitch on Top Layer "VSWITCH_L01_P058" (solid, remove dead copper, pour order 58): 16.625,70.25 16.85,70.25 23.877,70.25 ccw(c23.877,70.415) 23.961,70.272 ccw(c23.428,70.635) 23.759,71.187 ccw(c23.446,69.981) 23.372,71.225 22.448,71.225 cw(c22.594,71.467) 22.313,71.496 ccw(c21.147,71.311) 21.627,72.39 ccw(c20.779,71.27) 20.778,72.675 19.603,72.689 19.619,73.744 16.375,73.711 16.375,70.5 ccw(c16.625,70.5)
VDD on Top Layer "VDD_L01_P069" (solid, pour order 69): 9.025,72.35 9.025,69.9 ccw(c9.775,69.9) 9.775,69.15 15.4,69.15 ccw(c15.4,69.55) 15.8,69.55 15.8,71.65 ccw(c14.362,71.65) 14.362,73.088 9.763,73.088 ccw(c9.763,72.35)
SW-3V3 on Top Layer "SW-3V3_L01_P051" (solid, remove dead copper, pour order 51): 22.743,73.863 22.477,73.863 cw(c22.465,74.075) 22.252,74.088 22.252,75.886 cw(c22.591,75.886) 22.591,76.225 26.244,76.225 cw(c26.244,75.919) 26.55,75.919 26.55,74.174 cw(c26.277,74.138) 26.277,73.863 25.959,73.863 ccw(c26.358,73.213) 25.677,73.558 24.602,71.438 24.202,71.438 23.016,73.581 ccw(c22.364,73.221)
BSTNFIL3 on Top Layer "BSTNFIL3_L01_P068" (solid, pour order 68): 64.9,68.55 64.9,66.25 ccw(c65.6,66.25) 65.6,65.55 66.4,65.55 66.4,68.55
GND on Top Layer "GND_L01_P141" (solid, pour order 141): 46.075,32.475 52.875,32.475 ccw(c52.875,33.65) 54.05,33.65 54.05,38.325 ccw(c52.825,38.325) 52.825,39.55 48.753,39.55 ccw(c48.753,36.043) 46.273,38.523 45.652,37.902 ccw(c47.468,36.086) 44.9,36.086 44.9,33.65 ccw(c46.075,33.65)
MGTQ-PFIL3 on Top Layer "MGTQ-PFIL3_L01_P080" (solid, pour order 80): 67.05,69.475 74.9,69.475 ccw(c74.9,69.9) 75.325,69.9 75.325,70.775 ccw(c74.613,70.775) 74.613,71.487 71.025,71.487 71.025,73.175 67.075,73.175 ccw(c67.075,72.503) 66.403,72.503 66.403,70.122 ccw(c67.05,70.122)
5V on Top Layer "5V_L01_P087" (solid, pour order 87): 64.25,69.8 64.044,69.8 cw(c64.044,70.119) 63.725,70.119 ccw(c61.658,70.119) 63.119,71.581 62.404,72.296 ccw(c60.645,70.538) 60.645,73.025 59.95,73.025 cw(c59.95,73.2) 59.775,73.2 59.775,74.275 cw(c60.317,74.275) 60.317,74.817 63.908,74.817 cw(c63.908,74.225) 64.5,74.225 64.5,70.05 cw(c64.25,70.05)
BSTPFIL3 on Top Layer "BSTPFIL3_L01_P074" (solid, pour order 74): 65.025,72.85 65.025,70.525 ccw(c65.35,70.525) 65.35,70.2 66.1,70.2 ccw(c66.1,70.503) 66.403,70.503 66.403,72.847 ccw(c66.075,72.847) 66.075,73.175 65.35,73.175 ccw(c65.35,72.85)
BSTPFIL2 on Top Layer "BSTPFIL2_L01_P073" (solid, pour order 73): 34.75,20.05 34.75,16.075 ccw(c35.15,16.075) 35.15,15.675 36.2,15.675 ccw(c36.2,16.062) 36.587,16.062 36.587,16.813 ccw(c36.416,16.813) 36.463,16.977 ccw(c35.353,13.12) 35.15,17.129 35.15,20.05 ccw(c34.95,20.05) 34.95,20.25 ccw(c34.95,20.05)
MGTQ-PFIL2 on Top Layer "MGTQ-PFIL2_L01_P079" (solid, pour order 79): 41.036,17.129 36.929,17.129 ccw(c36.929,16.919) 36.718,16.913 36.743,15.997 cw(c36.388,15.987) 36.385,15.631 34.348,15.646 ccw(c34.344,15.152) 33.85,15.152 33.85,13.075 ccw(c34.2,13.075) 34.2,12.725 41.146,12.725 ccw(c41.146,13.044) 41.466,13.037 ccw(c-6.306,14.2) 41.41,16.774 ccw(c41.036,16.754)
5V on Top Layer "5V_L01_P085" (solid, pour order 85): 28.142,21.942 25.817,21.942 ccw(c25.817,21.775) 25.65,21.775 25.65,20.65 ccw(c26,20.65) 26,20.3 31.275,20.3 ccw(c31.275,20.525) 31.5,20.525 31.5,20.652 cw(c31.773,20.652) 31.773,20.925 33.375,20.925 ccw(c33.375,21.025) 33.475,21.025 33.475,21.375 ccw(c33.388,21.375) 33.387,21.462 32.186,21.462 cw(c32.186,22.123) 31.719,21.656 30.87,22.505 ccw(c30.219,21.855) 30.219,22.775 28.75,22.775 ccw(c28.75,22.474) 28.449,22.475 28.449,22.249 cw(c28.142,22.249)
BSTNFIL2 on Top Layer "BSTNFIL2_L01_P071" (solid, pour order 71): 32.275,20.05 32.275,17.575 cw(c31.95,17.575) 31.95,17.25 31.125,17.25 ccw(c31.125,16.85) 30.725,16.85 30.725,16.025 ccw(c31.175,16.025) 31.175,15.575 32.475,15.575 ccw(c32.475,16.05) 32.95,16.05 32.95,20.225 ccw(c32.85,20.225) 32.85,20.325 32.55,20.325 ccw(c32.55,20.05)
MGTQ-NFIL2 on Top Layer "MGTQ-NFIL2_L01_P078" (solid, remove dead copper, pour order 78): 26.059,16.509 26.051,13.249 ccw(c26.549,13.248) 26.549,12.75 33.325,12.75 ccw(c33.325,13.2) 33.775,13.2 33.775,15.225 ccw(c33.425,15.225) 33.425,15.575 30.989,15.575 cw(c30.989,15.839) 30.725,15.839 30.725,17.029 ccw(c30.604,17.029) 30.604,17.15 26.701,17.15 ccw(c26.701,16.508)
MGTQ-NFIL1 on Top Layer "MGTQ-NFIL1_L01_P075" (solid, pour order 75): 7.975,30.875 7.975,33.025 cw(c8.875,33.025) 8.875,33.925 14.975,33.925 cw(c14.975,33.675) 15.225,33.675 15.225,32.65 cw(c14.875,32.65) 14.875,32.3 12,32.3 ccw(c12,31.7) 11.4,31.7 11.4,31.075 cw(c10.85,31.075) 10.85,30.525 8.325,30.525 cw(c8.325,30.875)
5V on Top Layer "5V_L01_P083" (solid, remove dead copper, pour order 83): 17.825,29.85 17.825,25.175 ccw(c18,25.175) 18,25 20.45,25 20.426,27.675 18.4,27.675 cw(c18.4,27.7) 18.375,27.7 18.375,29.875 ccw(c18.275,29.875) 18.275,29.975 17.95,29.975 ccw(c17.95,29.85)
BSTPFIL1 on Top Layer "BSTPFIL1_L01_P070" (solid, pour order 70): 15.275,28.925 15.275,26.875 ccw(c15.375,26.875) 15.375,26.775 15.45,26.775 17.025,26.775 17.025,29.3 15.65,29.3 ccw(c15.65,28.925)
MGTQ-PFIL1 on Top Layer "MGTQ-PFIL1_L01_P076" (solid, remove dead copper, pour order 76): 8,30.349 8,27.013 ccw(c8.413,27.013) 8.413,26.6 14.775,26.6 ccw(c14.775,26.975) 15.15,26.975 15.15,28.7 ccw(c14.7,28.7) 14.7,29.15 12.054,29.15 cw(c12.054,30.736) 10.932,29.615 10.471,30.076 ccw(c9.468,29.073) 9.468,30.491 8.142,30.491 ccw(c8.141,30.35)
LPFIL3 on Top Layer "LPFIL3_L01_P067" (solid, pour order 67): 64.5,70.025 64.5,74.3 cw(c65.017,74.3) 65.017,74.817 68.158,74.817 cw(c68.158,74.35) 68.625,74.35 68.625,73.55 cw(c68.25,73.55) 68.25,73.175 65.215,73.175 ccw(c65.215,72.985) 65.025,72.985 65.025,70.025 cw(c64.8,70.025) 64.8,69.8 cw(c64.762,70.062)
LPFIL2 on Top Layer "LPFIL2_L01_P065" (solid, pour order 65): 34.225,20.725 34.225,20.525 ccw(c34.375,20.525) 34.375,20.375 35.025,20.375 cw(c35.025,20.05) 35.35,20.05 35.35,19.867 35.35,17.475 ccw(c35.575,17.475) 35.575,17.25 38.5,17.25 ccw(c38.5,17.65) 38.9,17.65 38.9,18.35 ccw(c38.573,18.35) 38.572,18.678 36.627,18.673 cw(c36.626,18.736) 36.564,18.736 36.564,20.586 ccw(c36.3,20.586) 36.3,20.85 34.35,20.85 ccw(c34.35,20.725)
LNFIL3 on Top Layer "LNFIL3_L01_P064" (solid, pour order 64): 64.625,68.85 ccw(c64.625,68.725) 64.5,68.725 64.5,64.237 ccw(c64.837,64.237) 64.838,63.9 68.1,63.9 ccw(c68.1,64.275) 68.475,64.275 68.475,65.125 ccw(c68.05,65.125) 68.05,65.55 65.337,65.55 cw(c65.337,65.987) 64.9,65.987 64.9,68.725 ccw(c64.775,68.725) 64.775,68.85
LPFIL1 on Top Layer "LPFIL1_L01_P063" (solid, remove dead copper, pour order 63): 13,26.15 13,25.45 ccw(c13.275,25.45) 13.275,25.175 17.324,25.175 ccw(c17.324,25.681) 17.83,25.681 17.83,26.585 17.83,29.57 ccw(c17.55,29.57) 17.55,29.85 17.175,29.85 ccw(c17.175,29.69) 17.015,29.69 17.015,26.585 13.435,26.585 ccw(c13.435,26.15)
LNFIL2 on Top Layer "LNFIL2_L01_P062" (solid, remove dead copper, pour order 62): 28.875,18.325 28.875,17.65 ccw(c29.275,17.65) 29.275,17.25 31.7,17.25 ccw(c31.7,17.825) 32.275,17.825 32.275,20.325 33.15,20.325 ccw(c33.15,20.6) 33.425,20.6 33.425,20.65 ccw(c33.225,20.65) 33.225,20.85 31.87,20.85 ccw(c31.87,20.13) 31.15,20.13 31.15,19.125 cw(c30.745,19.125) 30.745,18.72 29.27,18.72 ccw(c29.27,18.325)
VConv on Top Layer "VCONV_L01_P060" (solid, pour order 60): 19.2,77.976 19.2,76.7 ccw(c19.675,76.7) 19.675,76.225 26.025,76.225 ccw(c26.025,77.15) 26.95,77.15 26.95,77.75 ccw(c26.127,77.75) 26.127,78.573 19.799,78.573 ccw(c19.797,77.976)
VDD on POWER "VDD_L03_P057" (solid, remove dead copper, pour order 57): 76.752,86.097 76.75,11.725 cw(c73.225,11.725) 73.225,8.2 7.25,8.2 cw(c7.25,12.125) 3.325,12.125 3.325,84.655 cw(c5.75,84.655) 5.749,87.08 75.745,87.104 cw(c75.746,86.097)
5V on POWER "5V_L03_P056" (solid, pour order 56): 73.876,8.235 71.75,8.257 27.569,8.207 cw(c27.566,10.348) 25.425,10.349 25.425,18.4 ccw(c21.7,18.4) 21.7,22.125 11.299,22.125 cw(c11.299,25.983) 7.441,25.986 7.447,33.974 cw(c10.801,33.971) 10.801,37.325 25.425,37.325 40.118,37.279 cw(c40.115,36.109) 41.284,36.118 41.447,15.675 ccw(c41.775,15.677) 41.775,15.35 72.925,15.35 ccw(c72.925,15.675) 73.25,15.675 73.25,61.123 ccw(c71.439,61.123) 71.446,62.933 49.106,63.017 cw(c49.113,64.755) 47.375,64.755 47.375,75.808 cw(c48.692,75.808) 48.692,77.125 74.4,77.125 cw(c74.4,74.748) 76.777,74.748 76.777,11.106 cw(c73.906,11.106)
VConv on POWER "VCONV_L03_P053" (solid, pour order 53): 17.988,69.95 24.825,69.95 cw(c24.825,68.45) 26.325,68.45 26.325,64.675 cw(c24.358,64.39) 25.95,63.2 cw(c24.973,64.704) 24.6,62.95 10.305,62.95 cw(c10.305,64.18) 9.075,64.18 9.075,67.2 cw(c10.495,67.2) 10.495,68.62 15.525,68.62 ccw(c15.525,68.945) 15.85,68.945 15.85,77.345 cw(c17.405,77.345) 17.405,78.9 26.675,78.9 cw(c26.675,78.225) 27.35,78.225 27.35,76.325 cw(c26.725,76.325) 26.725,75.7 17.4,75.7 ccw(c17.4,74.888) 16.587,74.887 16.587,71.35 ccw(c17.988,71.35)
5V-MGTQ on POWER "5V-MGTQ_L03_P054" (solid, remove dead copper, pour order 54): 43.2,79.323 43.2,65.775 ccw(c44.152,65.775) 44.152,64.823 46.397,64.823 ccw(c46.397,65.778) 47.352,65.776 47.374,76.775 cw(c47.75,76.774) 47.75,77.15 74.75,77.15 ccw(c74.75,79.152) 76.752,79.152 76.752,85.668 ccw(c75.56,85.668) 75.56,86.86 71.84,86.86 ccw(c71.84,85.48) 70.46,85.48 70.46,82.241 cw(c69.157,82.241) 69.161,80.939 44.746,80.873 ccw(c44.75,79.323)
5V-ADCS on POWER "5V-ADCS_L03_P055" (solid, remove dead copper, pour order 55): 39.467,85.709 39.414,65.988 ccw(c40.575,65.985) 40.575,64.823 42.048,64.823 ccw(c42.048,65.975) 43.2,65.975 43.2,80.2 cw(c43.678,80.365) 43.676,80.87 69.679,80.946 ccw(c69.676,82.1) 70.829,82.13 cw(c115.904,83.3) 70.869,85.535 ccw(c69.628,85.597) 69.628,86.84 40.601,86.84 ccw(c40.601,85.706)
VSwitch on POWER "VSWITCH_L03_P052" (solid, pour order 52): 38.105,64.805 37.025,64.805 cw(c37.039,66.301) 35.975,65.25 cw(c36.937,66.118) 35.642,66.181 35.626,69.1 ccw(c34.793,69.095) 34.795,69.929 18.807,69.966 cw(c18.812,72.203) 16.575,72.203 16.575,73.7 cw(c18.575,73.7) 18.575,75.7 37.325,75.7 cw(c37.325,73.575) 39.45,73.575 39.45,70.6 39.45,66.15 cw(c38.105,66.15)
GND on Bottom Layer "GND_L06_P146" (solid, remove dead copper, pour order 146): 94.38,100.35 94.38,-2.95 94.53,-3.1 93.98,-3.65 -3.429,-3.65 -3.429,100.43
GND on Bottom Layer "GND_L06_P144" (solid, pour order 144): 53.925,75.646 ccw(c773.559,70.022) 53.95,61.8 40.25,61.8 40.25,75.625
5V-MGTQ on Bottom Layer "5V-MGTQ_L06_P143" (solid, pour order 143): 47.425,67.25 47.425,65.501 cw(c46.505,65.405) 46.505,64.48 43.17,64.48 cw(c43.17,64.995) 42.655,64.995 42.655,68.23 cw(c43.38,68.23) 43.38,68.955 46.345,68.955 cw(c46.345,68.82) 46.48,68.82 46.48,67.67 ccw(c46.57,67.67) 46.57,67.58 47.095,67.58 cw(c47.095,67.25)
5V on Bottom Layer "5V_L06_P142" (solid, pour order 142): 48.325,68.65 48.325,67.575 47.425,67.575 47.425,65.2 ccw(c48.15,65.2) 48.15,64.475 51.85,64.475 ccw(c51.85,65.425) 52.8,65.425 52.8,68.2 ccw(c52,68.2) 52,69 48.675,69 ccw(c48.675,68.65)
GND on PGND (split plane): 195 vertices, not listed, extent -2.907,0.497 86.243,95.483
PGND on PGND (split plane): 76.171,12.539 6.619,12.539 6.619,78.921 32.497,78.921 32.497,32.38 32.507,32.33 32.535,32.288 32.577,32.26 32.626,32.251 65.5,32.251 65.55,32.26 65.592,32.288 65.62,32.33 65.629,32.38 65.629,60.04 65.62,60.09 65.592,60.132 65.55,60.16 65.5,60.169 56.349,60.169 56.349,81.075 56.34,81.125 56.312,81.167 56.27,81.195 56.22,81.205 46.129,81.205 46.129,89.231 76.171,89.231
GND on GND (split plane): 195 vertices, not listed, extent -2.907,0.497 86.243,95.483

## Other copper
PGND (plane layer: these items are gaps in the copper):
  lines w0.254: 6.49,12.41 6.49,79.05 32.626,79.05 32.626,32.38 65.5,32.38 65.5,60.04 56.22,60.04 56.22,81.075 46,81.075 46,89.36 47.93,89.36 76.3,89.36 76.3,12.41 6.49,12.41

## Silkscreen, mask and mechanical layers (free items; w line width, h text height)
Top Overlay:
  text "ADCS Board v.1 - Designed by Espaco^3" at 11.999,4.831 h3
Board Layer Stack Bottom Overlay:
  drawing of 135 lines, arcs and shapes, not listed
Mechanical 1:
  lines w0.013: 83.671,95.992 77.154,95.992 ccw(c77.154,95.59) 76.752,95.59 76.752,95.194 cw(c75.551,95.194) 75.551,93.992 7.784,93.992 cw(c7.784,95.194) 6.588,95.076 6.584,95.476 ccw(c6.177,95.471) 6.182,95.877 -2.333,95.877 ccw(c-2.333,94.794) -3.416,94.794 -3.416,59.279 ccw(c-3.015,59.279) -3.015,58.877 -2.618,58.877 cw(c-2.618,57.676) -1.416,57.676 -1.416,1.069 ccw(c-0.334,1.069) -0.334,-0.013 10.182,-0.013 ccw(c10.182,0.389) 10.584,0.389 10.584,1.786 cw(c11.785,1.786) 11.667,2.982 71.554,2.987 cw(c71.554,1.783) 72.752,1.902 72.752,0.503 ccw(c73.153,0.503) 73.153,0.102 85.669,0.102 ccw(c85.669,1.185) 86.752,1.185 86.752,36.7 ccw(c86.351,36.7) 86.351,37.102 85.954,37.102 cw(c85.954,38.304) 84.752,38.304 84.752,94.91 ; 191.948,95.085 cw(c193.029,95.085) 193.029,96.167
Bottom Designator:
  lines w0.254: 71.37,38.06 78.87,38.06